# Altium PCB Skipper.PcbDoc (part 2 of 3)
Units mm, origin at the board's own origin, x right, y up, seen from the top; angles counter-clockwise.
Board outline 132 x 77.5 mm, 4 copper layers (L1, L2, L3, L4), stack 1.586 mm thick; 219 components, 173 nets, 859 pads, 487 vias.
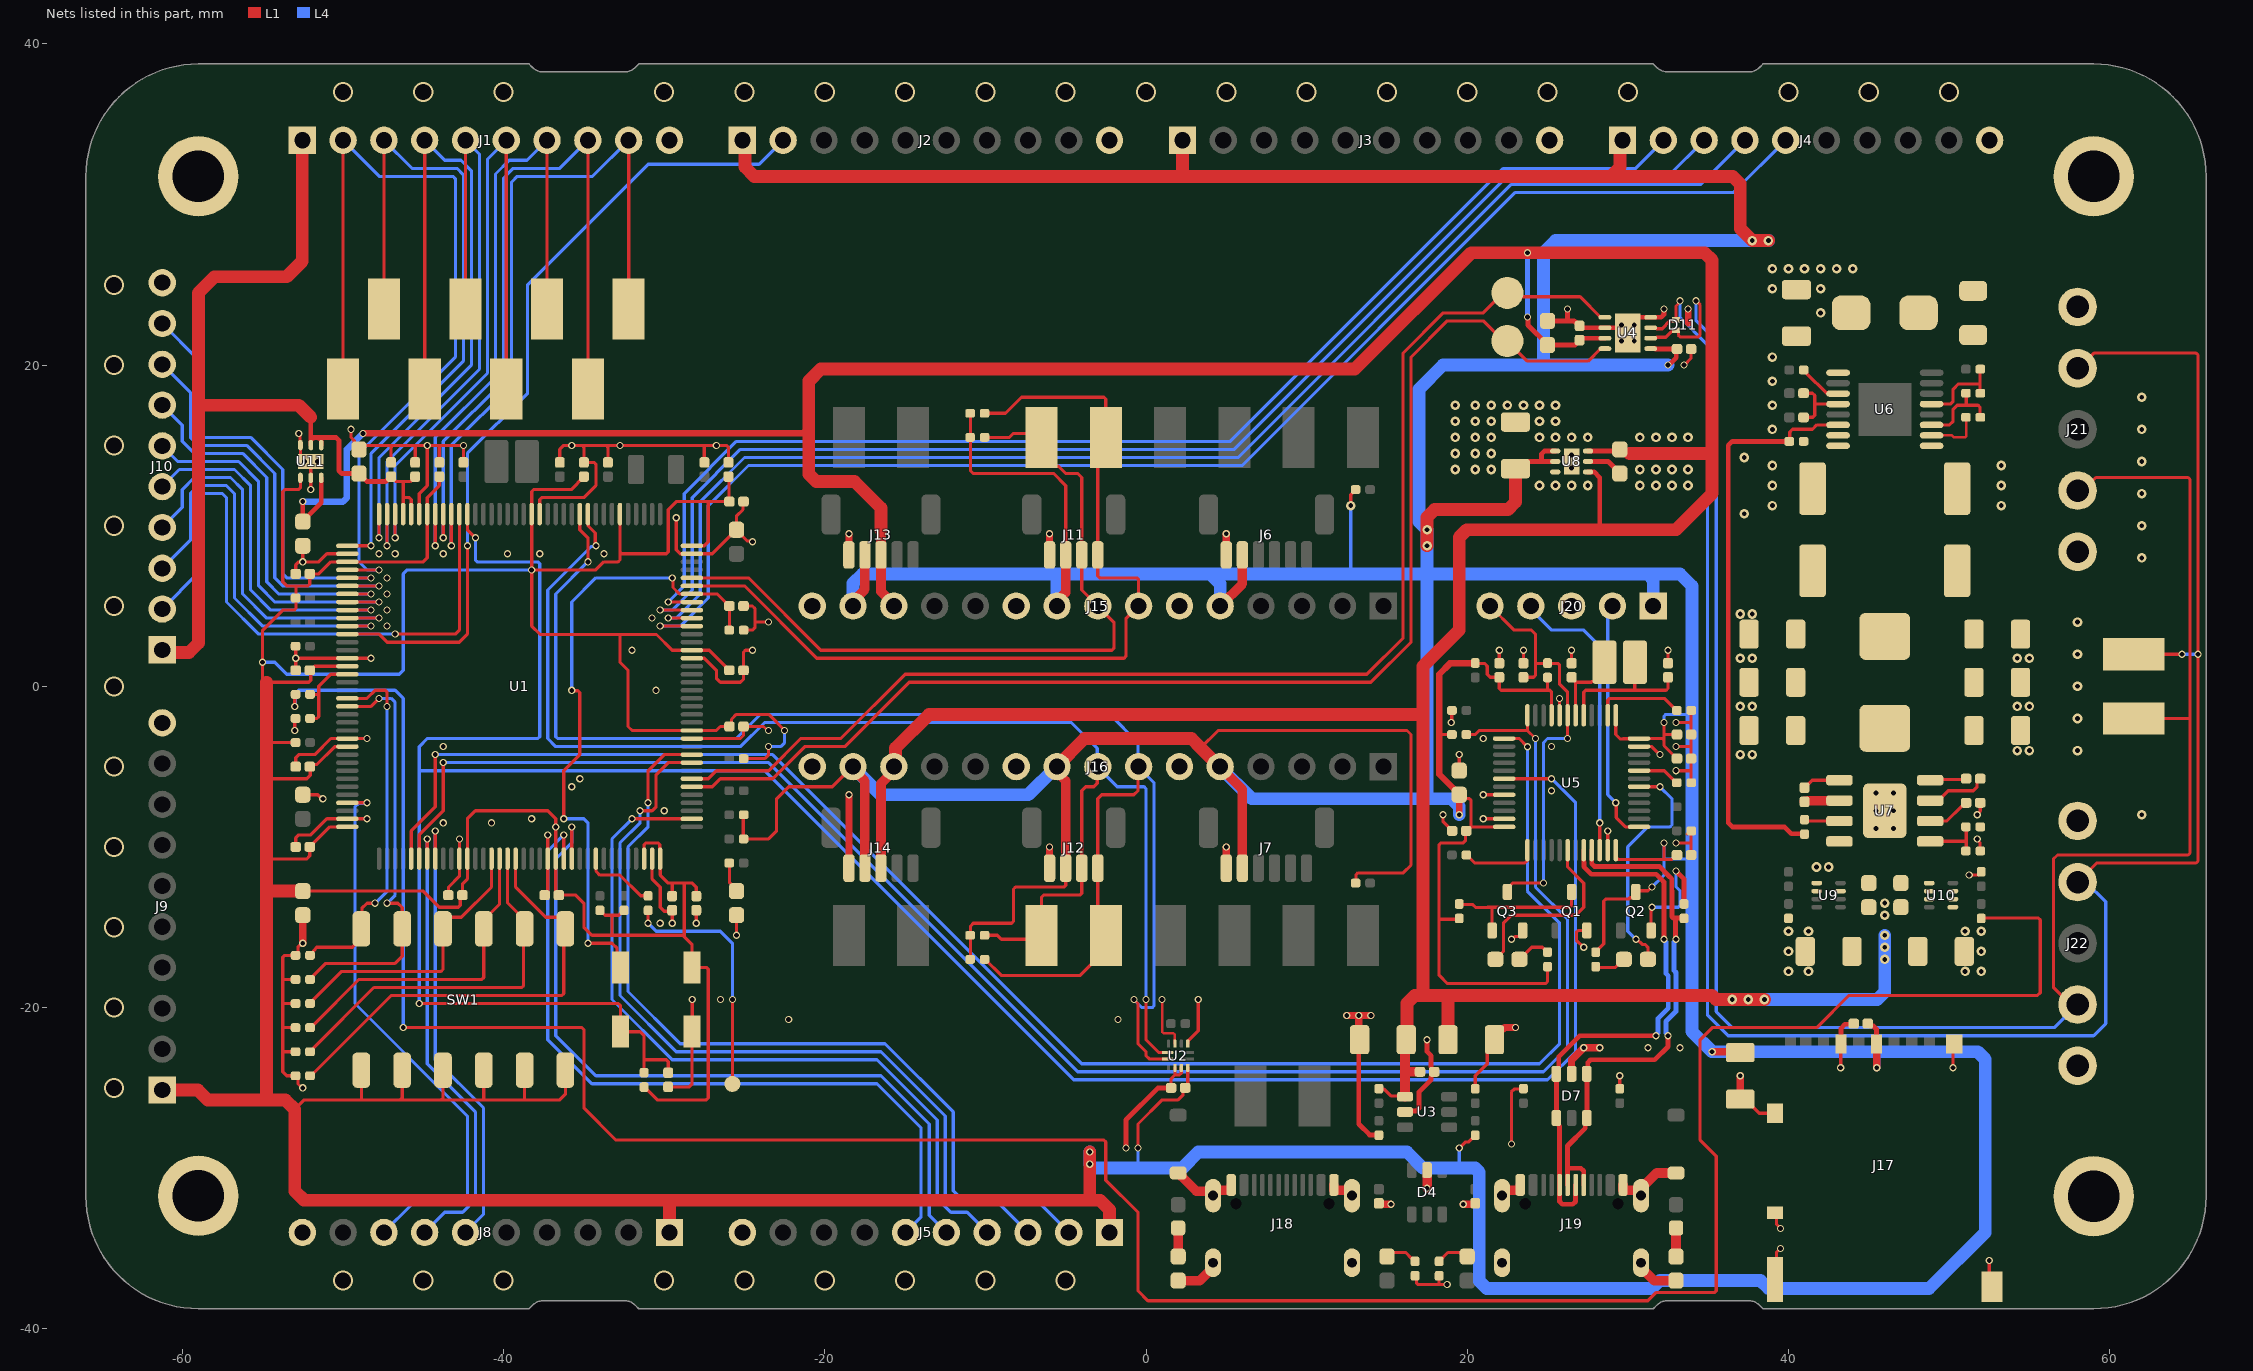
[diagram p4: the nets of this part, all layers, seen from the top]

## Via types
v1: diameter 0.45, hole 0.3, L1 to L4, tented both sides, 298 vias
v2: diameter 0.6, hole 0.3, L1 to L4, tented both sides, 127 vias
v3: diameter 1.25, hole 1, L1 to L4, 39 vias
v4: diameter 0.6, hole 0.3, L1 to L4, 15 vias
v5: diameter 0.5, hole 0.3, L1 to L4, 8 vias

## Nets (pads, with @x,y where several pads share a name; then routed paths per layer and width w, separated by ;. In a path a pad name is that pad's centre, name@x,y a point inside that pad or via, vN(x,y) a via of type N, cw(c..) or ccw(c..) an arc to the next point about the centre after c; other vN are vias at no path point)
3.3V: C7.2 C8.2 C9.2 C10.2 C11.2 C12.2 C13.2 C14.2 C15.2 C16.2 C17.2 C18.2 C19.2 C20.2 C21.2 C26.2 C27.2 C30.2 C38.2 C42.2 C43.2 C44.2 C45.2 C46.2 C47.2 C63.2 J2.1 J3.1 J4.1 J5.1 J6.2 J7.2 J8.1 J9.1 J11.2 J12.2 J13.2 J14.2 J15.5 J15.9 J15.14 J16.5 J16.9 J16.14 J17.4 J20.1 Q2.3 R1.2 R8.2 R14.2 R15.2 R16.2 R17.2 R20.2 R22.2 R23.2 R24.2 R25.2 R26.2 R27.2 R28.2 R33.2 R41.2 R42.2 R44.2 R46.2 R47.2 R49.1 SW1.1 SW1.2 SW1.3 SW1.4 SW1.5 SW1.6 SW2.2 U1.6 U1.17 U1.30 U1.39 U1.52 U1.62 U1.72 U1.84 U1.95 U1.106 U1.108 U1.121 U1.131 U1.144 U2.12 U4.5 U5.1 U5.9 U5.24 U5.36 U5.48 U8.1 U8.2 U11.4 | length 907.3
  L1 w0.2: -54.75,-10.75 -52.25,-10.75 -52.06,-10.56 C11.2@-52.06,-10 -50.81,-8.75 U1.72@-49.725,-8.75 ; -54.75,-5.75 -52.25,-5.75 -52.04,-5.54 -52.04,-5 C10.2@-52.06,-5 -51.928,-4.868 -51.618,-4.868 -50.515,-3.765 -49.74,-3.765 U1.62@-49.725,-3.75 ; -54.75,-3.5 R28.2@-52.925,-3.5 ; -53,-26.336 -52.414,-25.75 -48.85,-25.75 ; U11.4@-52.65,12.988 -52.65,12.367 -52.767,12.25 -53.633,12.25 -53.75,12.133 -53.75,6.5 -53.5,6.25 -53,6.25 ; C21.2@-52.5,-12.75 -45,-12.75 -44,-13.75 -42.808,-13.75 -42.691,-13.633 -42.691,-13.131 C12.2@-42.56,-13 -42.56,-12.31 -42.25,-12 U1.84@-42.25,-10.725 -42.25,-8.25 -41.75,-7.75 -37.25,-7.75 -36.75,-8.25 v1(-36.75,-8.75) U1.95@-36.75,-10.725 -36.75,-12.81 C13.2@-36.56,-13 ; U1.52@-49.725,1.25 -51.76,1.25 -52.01,1 C9.2@-52.06,1 -52,0.94 -52,0.367 -52.117,0.25 -54.75,0.25 -55,0.5 v1(-55,1.5) -55,3.5 -53.75,4.75 -53.042,4.75 -52.925,4.867 -52.925,5.5 -52.925,6.175 -53,6.25 ; SW1.1@-48.85,-23.9 -48.85,-25.75 ; SW1.2@-46.31,-23.9 -46.31,-25.62 -46.44,-25.75 ; C20.2@-44,13.06 -44,12.5 -44.75,11.75 U1.30@-44.75,10.725 -44.75,8 -45,7.75 U1.39@-49.725,7.75 -50.75,7.75 -51.5,7 C8.2@-52.06,7 -52.06,6.367 -52.177,6.25 -53,6.25 ; SW1.3@-43.77,-23.9 -43.77,-25.645 -43.875,-25.75 ; SW1.4@-41.23,-23.9 -41.23,-25.73 -41.25,-25.75 ; SW1.5@-38.69,-23.9 -38.69,-25.69 -38.75,-25.75 ; C13.2@-36.428,-13.132 C13.2@-36.56,-13 ; SW1.6@-36.15,-23.9 -36.15,-25.4 -36.5,-25.75 -38.75,-25.75 ; C19.2@-35,13.06 -35,13.04 -35.79,12.25 -38.133,12.25 -38.25,12.133 U1.17@-38.25,10.725 v1(-38.25,7.25) ; R22.2@-34,-13.955 -33.805,-14.15 -33.775,-14.15 -33.675,-14.25 -33.25,-14.25 ; U1.6@-32.75,10.725 -32.75,8.367 ; R23.2@-32.5,-13.925 -32.5,-13.955 -32.672,-14.127 -32.702,-14.127 -32.825,-14.25 -33.25,-14.25 ; R20.2@-31.25,-24.925 -31.25,-24.955 -31.078,-25.127 -31.048,-25.127 -30.425,-25.75 -27.367,-25.75 -27.25,-25.633 -27.25,-17.617 -27.367,-17.5 SW2.2@-28.275,-17.5 -28.275,-16.059 -28.75,-15.584 ; U1.106@-31.231,-10.744 U1.106@-31.25,-10.725 -31.25,-9.867 -31.133,-9.75 -30.386,-9.75 -30.269,-9.867 -30.269,-10.706 U1.108@-30.25,-10.725 -30.244,-10.731 -30.244,-11.756 -29.75,-12.25 -29.5,-12.25 ; C14.2@-29.5,-13.06 -29.5,-12.25 ; U1.144@-28.275,8.75 -28.269,8.756 -27.494,8.756 -27.25,9 -27.25,11.5 ; C15.2@-28,-13.06 -28,-12.5 -28.25,-12.25 -28.75,-12.25 ; C7.2@-26,13.06 -25.97,13.03 -25.97,11.53 C18.2@-25.94,11.5 -27.25,11.5 ; C17.2@-25.94,1 -27.184,2.244 -28.269,2.244 U1.131@-28.275,2.25 -29.5,2.25 -30.475,3.225 -32.75,3.225 ; C16.2@-25.92,-2.5 C16.2@-25.94,-2.5 ; R25.2@-25.075,-8 -25.075,-9.5 -23.5,-9.5 -23,-9 -23,-7 -22.25,-6.25 -19.53,-6.25 J16.14@-18.28,-5 ; R26.2@-25.075,-4.5 -23.75,-4.5 -23.5,-4.25 v1(-23.5,-3.75) ; v1(-22.5,-2.75) -23.5,-1.75 -25.5,-1.75 -25.808,-2.058 -25.808,-2.368 C16.2@-25.94,-2.5 ; R16.2@-10.925,-17 -10.925,-15.5 -10.925,-14.925 -10.75,-14.75 -8.367,-14.75 -8.25,-14.633 -8.25,-12.617 -8.133,-12.5 -5.117,-12.5 -5,-12.383 J12.2@-5,-11.32 ; R14.2@-10.925,17 -10.925,15.5 -10.925,13.425 -10.75,13.25 -5.75,13.25 -5,12.5 J11.2@-5,8.18 ; v1(-0.5,-28.75) -0.5,-27.25 1,-25.75 2,-25.75 2.308,-25.442 2.308,-25.132 C30.2@2.44,-25 2.6,-24.84 U2.12@2.6,-23.75 ; 3.415,-3.835 4.5,-2.75 16.25,-2.75 16.5,-3 16.5,-11.133 16.017,-11.615 13.192,-11.615 13.075,-11.733 R8.2@13.075,-12.25 ; v2(12.75,11.25) 12.75,11.925 12.873,12.048 12.873,12.078 13.045,12.25 R1.2@13.075,12.25 ; 18.25,-3 R44.2@19.075,-3 ; v1(19.5,-28.75) 19.871,-28.379 20.076,-28.379 20.5,-27.955 R33.2@20.5,-27.925 ; R46.2@19.5,-14.425 19.425,-14.5 18.25,-14.5 ; C42.2@19.5,-6.75 19.738,-6.988 20.123,-6.988 20.24,-7.105 20.24,-8.75 ; R49.1@20.5,1.425 21.075,1.425 21.25,1.25 21.25,0.75 21.44,0.56 C44.2@22,0.56 22,-0.133 22.117,-0.25 25,-0.25 ; U5.24@22.3,-8.75 20.24,-8.75 ; R42.2@25,-17.425 25,-18.383 24.883,-18.5 18.75,-18.5 18.25,-18 18.25,-14.5 ; R47.2@25,0.575 25,-0.25 ; U5.9@25.25,-1.8 25.25,-0.367 25.133,-0.25 25,-0.25 ; R41.2@28,-16.575 28,-16.525 28.5,-16.025 28.5,-13.367 28.617,-13.25 30.05,-13.25 30.132,-13.168 30.304,-13.168 30.5,-12.972 Q2.3@30.5,-12.8 30.5,-12.627 30.603,-12.73 31.258,-12.73 31.488,-12.5 v1(31.5,-12.5) ; U5.36@29.25,-10.2 29.25,-10.723 29.296,-10.769 29.404,-10.769 29.417,-10.783 32.25,-10.783 ; U5.1@29.25,-1.8 29.25,-3 29.532,-3.282 29.697,-3.282 29.71,-3.269 30.681,-3.269 U5.48@30.7,-3.25 32.155,-3.25 ; v1(32.25,-9.75) 32.25,-10.783 ; v1(32.25,-2.25) 32.25,-3 ; C46.2@33.06,-10.5 33.01,-10.5 32.728,-10.783 32.25,-10.783 ; C47.2@33.06,-4.5 32.25,-3.69 32.25,-3.345 ; C43.2@33.06,-3 32.25,-3 ; -48.85,-25.75 -46.44,-25.75 ; -46.44,-25.75 -43.875,-25.75 ; -43.875,-25.75 -41.25,-25.75 ; -41.25,-25.75 -38.75,-25.75 ; v1(-38.25,7.25) -38.25,3.75 -37.725,3.225 -32.75,3.225 ; v1(-38.25,7.25) -34.25,7.25 -33.75,7.75 -32.867,7.75 -32.75,7.867 -32.75,8.367 ; C13.2@-36.56,-13 -35.5,-13 -35,-13.5 -35,-15 -34.5,-15.5 -33.25,-15.5 ; -33.25,-15.5 -33.25,-14.25 ; -33.25,-15.5 -28.834,-15.5 -28.75,-15.584 ; -32.75,3.225 -32.75,1.5 -32.25,1 -32.25,-2.5 -32,-2.75 U1.121@-28.275,-2.75 -26.75,-2.75 -26.5,-2.5 C16.2@-25.94,-2.5 ; -32.75,8.367 -32.633,8.25 -29.867,8.25 -29.75,8.367 -29.75,11 -29.25,11.5 -27.25,11.5 ; -29.5,-12.25 -28.75,-12.25 ; -28.75,-15.584 -28.75,-12.25 ; 18.25,-14.5 18.25,-9.867 18.367,-9.75 19.75,-9.75 19.89,-9.61 19.89,-9.1 20.24,-8.75 ; 32.155,-3.25 32.25,-3.25 32.25,-3.345 ; 32.155,-3.25 32.25,-3.345 ; 32.25,-3.345 32.25,-3
  L1 w0.3: C63.2@23,13.55 23.316,13.55 23.766,14 24.627,14 ; U8.2@25.488,14 24.627,14 ; U8.1@25.488,14.65 24.803,14.65 24.627,14.474 24.627,14 ; U4.5@31.425,21.025 31.7,21.025 31.725,21 C38.2@33.06,21 33.012,20.952 33.012,20.462 32.579,20.029 32.529,20.029 v1(32.5,20) ; C26.2@44.94,-21 45.097,-21.157 45.297,-21.157 45.475,-21.335 J17.4@45.475,-22.275
  L1 w0.4: v1(19.5,-8) C42.2@19.5,-6.75 19.5,-6.725 18.25,-5.475 18.25,-3 18.25,0.75 18.925,1.425 R49.1@20.5,1.425
  L1 w0.45: v1(35.25,-22.75) C27.2@36.95,-22.75 ; J17.4@45.475,-22.275 45.5,-22.3 v1(45.5,-23.75)
  L1 w0.6: J16.14@-18.28,-5 -18.28,-5.121 -17.5,-5.901 J14.2@-17.5,-11.32 ; J15.14@-18.24,5 -18.24,5.298 -17.5,6.038 J13.2@-17.5,8.18 ; J16.9@-5.58,-5 -5.58,-5.298 -5,-5.878 J12.2@-5,-11.32 ; J15.9@-5.54,5 -5.54,5.298 -5,5.838 J11.2@-5,8.18 ; J16.5@4.58,-5 6,-6.42 J7.2@6,-11.32 ; J15.5@4.62,5 6,6.38 J6.2@6,8.18
  L1 w0.8: J9.1@-61.25,-25.13 -59.034,-25.13 -58.414,-25.75 -54.75,-25.75 ; -54.75,0.25 -54.75,-3.5 -54.75,-5.75 -54.75,-10.75 -54.75,-12.75 ; C21.2@-52.5,-12.75 -54.75,-12.75 ; J8.1@-29.67,-34 -29.67,-32.17 -29.5,-32 ; J2.1@-25.13,34 -24.973,33.843 -24.973,32.336 -24.387,31.75 2.25,31.75 ; J16.9@-5.58,-5 -3.83,-3.25 2.83,-3.25 3.415,-3.835 J16.5@4.58,-5 ; v1(-3.5,-29) v1(-3.5,-29.75) -3.5,-32 ; J5.1@-2.27,-34 -2.27,-32.586 -2.856,-32 -3.5,-32 ; J3.1@2.27,34 2.27,31.77 2.25,31.75 ; v2(17.5,8.75) v2(17.5,9.75) 17.5,10.531 17.969,11 22.531,11 23,11.469 C63.2@23,13.55 ; J4.1@29.67,34 29.513,33.843 29.513,32.336 28.927,31.75 ; C27.2@36.95,-22.75 C27.2@37,-22.8 ; v2(38.75,27.75) v2(37.75,27.75) 37,28.5 37,31.281 36.531,31.75 28.927,31.75 ; -54.75,-25.75 -53.586,-25.75 -53,-26.336 -53,-31.414 -52.414,-32 -29.5,-32 ; -54.75,-25.75 -54.75,-12.75 ; -29.5,-32 -3.5,-32 ; 2.25,31.75 28.927,31.75
  L4 w0.2: v1(-55,1.5) -54.25,1.5 -53.5,0.75 -46.5,0.75 -46.25,1 -46.25,7 -46,7.25 v1(-38.25,7.25) ; v1(-23.5,-3.75) -22.75,-3.75 -22.5,-3.5 v1(-22.5,-2.75) ; -0.75,-30 -0.5,-29.75 v1(-0.5,-28.75) ; 12.75,7 v2(12.75,11.25) ; 19.25,-30 19.5,-29.75 v1(19.5,-28.75) ; v1(31.5,-12.5) 32.25,-11.75 32.25,-10.75 ; v1(32.25,-9.75) 32.25,-10.75 ; v1(32.25,-2.25) 32.25,-1.867 32.367,-1.75 34,-1.75 ; 34,-10.75 32.25,-10.75
  L4 w0.45: v1(45.5,-23.75) 45.5,-22.75
  L4 w0.8: J16.14@-18.28,-5 -16.53,-6.75 -7.33,-6.75 J16.9@-5.58,-5 ; J15.14@-18.24,5 -18.24,6.414 -17.654,7 -5.5,7 ; J15.9@-5.54,5 -5.54,6.96 -5.5,7 ; v1(-3.5,-29) v1(-3.5,-29.75) -3.25,-30 -0.75,-30 2.25,-30 3.25,-29 16.25,-29 17.25,-30 19.25,-30 20.5,-30 20.75,-30.25 20.75,-37.031 21.219,-37.5 31.5,-37.5 32,-37 38.25,-37 38.75,-37.5 48.75,-37.5 52.25,-34 52.25,-23.219 51.781,-22.75 45.5,-22.75 v1(35.25,-22.75) 34,-21.5 34,-10.75 34,-1.75 34,6.25 33.25,7 31.22,7 ; J16.5@4.58,-5 6.58,-7 17.5,-7 ; J15.5@4.62,5 4.62,6.38 4,7 ; v1(19.5,-8) 19.5,-7.469 19.031,-7 17.5,-7 ; J20.1@31.58,5 31.58,6.64 31.22,7 ; v1(32.5,20) 24.75,20 ; v2(38.75,27.75) v2(37.75,27.75) 25.5,27.75 24.75,27 24.75,20 ; -5.5,7 4,7 ; 4,7 12.75,7 17.5,7 ; 17.5,-7 17.5,7 ; 17.5,7 v2(17.5,8.75) v2(17.5,9.75) 17,10.25 17,18.5 18.5,20 24.75,20 ; 17.5,7 31.22,7
3.3VA: C22.2 C23.2 C69.2 J1.1 J10.1 U1.32 U1.33 U11.1 U11.2 | length 61.8
  L1 w0.2: C23.2@-47,13.06 -46.69,12.75 -46.255,12.75 ; U1.33@-46.25,10.725 -46.25,11.75 ; U1.32@-45.75,10.725 -45.75,11.633 -45.867,11.75 -46.25,11.75 ; C22.2@-45.632,12.928 C22.2@-45.5,13.06 -45.51,13.06 -45.82,12.75 -46.255,12.75 ; -46.255,12.75 -46.25,12.745 -46.25,11.75
  L1 w0.3: U11.2@-52,15.012 U11.2@-52,15.311 ; -52,16.75 U11.2@-52,15.311 ; U11.1@-51.35,15.2 -51.35,15.012 -51.35,15.311 -51.526,15.487 ; C23.2@-47,13.06 -47,13.043 -47.16,12.883 -47.203,12.883 -47.336,12.75 -48.499,12.75 C69.2@-49,13.25 -50.074,13.25 -50.25,13.426 -50.25,15.311 -50.426,15.487 -51.526,15.487 ; U11.2@-52,15.311 -51.824,15.487 -51.526,15.487
  L1 w0.8: J10.1@-60.9,2.113 -59.586,2.113 -59,2.699 -59,17.5 ; J1.1@-52.53,34 -52.53,26.47 -53.5,25.5 -58,25.5 -59,24.5 -59,17.5 ; -52,16.75 -52.75,17.5 -59,17.5
  L1 w1: J10.1@-61.25,2.27 -61.057,2.27 J10.1@-60.9,2.113
5V: C31.2 C32.2 C33.2 C36.2 C37.2 C62.2 C66.2 C67.2 C68.2 J13.3 J14.3 J15.13 J16.13 R32.2 U3.1 U4.3 U8.4 U8.6 U10.2 U10.7 U11.6 | length 289.1
  L1 w0.2: R32.2@14.5,-25.075 14.825,-25.075 15.25,-25.5 16.075,-25.5 U3.1@16.125,-25.55
  L1 w0.3: v1(-52.5,11.5) -52.5,10.275 -51.35,11.425 U11.6@-51.35,12.988 ; v1(23.75,23) 23.779,22.971 23.779,22.496 25,21.275 C36.2@25,21.25 26.707,21.25 27.132,21.675 U4.3@28.575,21.675 ; U8.4@27.513,13.35 27.9,13.35 28.25,13 28.25,9.75 ; U8.6@27.513,14.65 29.4,14.65 C62.2@29.5,14.75 29.769,14.481 30.103,14.481 ; 32.179,14.487 32.442,14.75
  L1 w0.4: v1(-48.75,15.75) -21.359,15.75 -21,16.109
  L1 w0.6: J14.3@-16.5,-11.32 -16.5,-6.058 -15.74,-5.298 J16.13@-15.74,-5 ; -16.5,9.75 J13.3@-16.5,8.18 -16.5,5.901 -15.7,5.101 J15.13@-15.7,5 ; U3.1@16.125,-25.55 16.125,-24 ; C31.2@16.2,-22 16.125,-22.075 16.125,-24 ; C33.2@17.06,-24 16.125,-24
  L1 w0.8: -16.5,9.75 -16.5,11.1 -18.15,12.75 -20.531,12.75 -21,13.219 -21,16.109 -21,19 -20.25,19.75 13,19.75 20.25,27 v1(23.75,27) 34.781,27 35.25,26.531 35.25,14.281 ; J16.13@-15.74,-5 -15.595,-4.855 -15.595,-3.845 -13.5,-1.75 17.25,-1.75 ; C31.2@16.2,-22 16.25,-21.95 16.25,-19.734 16.734,-19.25 17.25,-19.25 ; C32.2@18.8,-22 18.8,-19.45 19,-19.25 ; 30.103,14.487 32.179,14.487 35.045,14.487 35.25,14.281 ; v2(38.5,-19.5) v2(37.5,-19.5) v2(36.5,-19.5) 35.5,-19.5 35.25,-19.25 19,-19.25 ; 17.25,-19.25 19,-19.25 ; 17.25,-19.25 17.25,-1.75 ; 17.25,-1.75 17.25,1.25 19.5,3.5 19.5,9.281 19.969,9.75 28.25,9.75 33,9.75 35.25,12 35.25,14.281
  L4 w0.3: v1(23.75,23) v1(23.75,27)
  L4 w0.4: v1(-52.5,11.5) -50,11.5 -49.75,11.75 -49.75,14.75 v1(-48.75,15.75)
  L4 w0.8: v2(36.5,-19.5) v2(37.5,-19.5) v2(38.5,-19.5) 45.531,-19.5 46,-19.031 v2(46,-17) v2(46,-16.25) v2(46,-15.5)
5V_BUCK: C56.2 C57.2 C58.2 L1.2 R10.2 R56.2 R62.2 U10.3 U10.5 | length 171.9
  L1 w0.2: v1(-53,-1.25) -53,-0.575 R10.2@-52.925,-0.5 ; v1(-46.25,-21.25) -35.117,-21.25 -35,-21.367 -35,-26.25 -33,-28.25 -2.617,-28.25 -2.5,-28.367 -2.5,-30.75 -0.5,-32.75 -0.5,-37.633 0.117,-38.25 31.25,-38.25 31.75,-37.75 35.383,-37.75 35.5,-37.633 35.5,-29.25 34.5,-28.25 34.5,-22 35.25,-21.25 41.75,-21.25 43.75,-19.25 55.5,-19.25 55.675,-19.075 55.675,-14.542 55.558,-14.425 R62.2@52,-14.425
  L4 w0.2: v1(-53,-1.25) -52.975,-1.225 -52.975,-0.475 -52.75,-0.25 -46.75,-0.25 -46.25,-0.75 v1(-46.25,-21.25)
5V_USB: C64.2 C65.2 U9.2 U9.7 U10.6
BOOT_0_3: C25.2 R21.2 SW2.1 U1.138 | length 39.6
  L1 w0.2: v1(-36.25,-8.25) -36.25,-5.25 -35.25,-4.25 -35.25,-0.392 -35.367,-0.275 -35.725,-0.275 v1(-35.75,-0.25) ; v1(-34.75,-16) -33.25,-16 -32.933,-16.317 -32.933,-17.292 SW2.1@-32.725,-17.5 ; v1(-29.5,6.75) -29.452,6.702 -29.452,6.152 -29.054,5.754 -28.279,5.754 U1.138@-28.275,5.75 -26.69,5.75 C25.2@-25.94,5 -25.94,3.515 R21.2@-25.925,3.5
  L4 w0.2: v1(-36.25,-8.25) -35,-8.25 -34.75,-8.5 v1(-34.75,-16) ; v1(-35.75,-0.25) -35.75,5.25 -34.25,6.75 v1(-29.5,6.75)
BUCK_BOOT_10: C48.2 U7.7 | length 3.9
  L1 w0.2: U7.7@48.825,-7.115 49.325,-7.115 49.94,-6.5 51.5,-6.5 51.744,-6.256 51.744,-5.946 C48.2@51.94,-5.75
BUCK_DETECT_2: R10.1 R13.2 U1.53 | length 5.2
  L1 w0.2: R13.2@-52.075,-2 -51.617,-2 -51.5,-1.883 -51.5,-0.5 ; R10.1@-52.075,-0.5 -51.5,-0.5 ; U1.53@-49.725,0.75 -50.75,0.75 -51.5,0 -51.5,-0.5
BUCK_EN_10: R54.1 U7.3 | length 2.2
  L1 w0.2: R54.1@41,-8.385 U7.3@43.175,-8.385
BUCK_FB_10: R56.1 R58.2 U7.5 | length 3.8
  L1 w0.2: U7.5@48.837,-9.643 50.962,-9.643 51.075,-9.757 ; R58.2@51.075,-10.25 51.075,-9.757 ; R56.1@51.075,-8.75 51.075,-9.757
BUCK_SW_10: C48.1 L1.1 U7.8 | length 2.3
  L1 w0.2: U7.8@48.825,-5.845 48.872,-5.797 51.012,-5.797 C48.1@51.06,-5.75
BUCK_VCC_10: C55.2 U7.6 | length 2.7
  L1 w0.2: U7.6@48.825,-8.385 49.865,-8.385 50.79,-7.46 50.8,-7.46 51.01,-7.25 C55.2@51.06,-7.25
CAN_H: D11.1 J21.4 J22.4 TP30.1 U4.7 | length 135.2
  L1 w0.2: U4.7@31.425,22.325 31.727,22.325 31.787,22.265 32.137,22.265 32.622,22.75 32.925,22.75 D11.1@33,22.825 33,23.682 33.25,23.932 v1(33.25,24) ; J22.4@58,-12.19 59.19,-11 65.383,-11 65.5,-10.883 v1(65.5,2) 65.5,20.633 65.383,20.75 59.016,20.75 58.076,19.81 J21.4@58,19.81 ; TP30.1@61.5,2 v1(64.5,2)
  L4 w0.2: v1(33.25,24) 33.25,22.976 34.953,21.273 34.953,-20.453 36.25,-21.75 59,-21.75 59.75,-21 59.75,-13.417 58.523,-12.19 J22.4@58,-12.19 ; v1(64.5,2) v1(65.5,2)
CAN_L: D11.2 J21.2 J22.2 TP31.1 U4.6 | length 126.9
  L1 w0.2: U4.6@31.425,21.675 31.727,21.675 31.787,21.735 32.357,21.735 32.722,22.1 32.925,22.1 D11.2@33,22.175 33.075,22.175 33.15,22.1 33.15,21.867 33.267,21.75 34.383,21.75 34.5,21.867 34.5,23.75 v1(34.25,24) ; J22.2@58,-19.81 57.577,-19.81 56.5,-18.733 56.5,-10.75 56.75,-10.5 64.883,-10.5 65,-10.383 65,-2 ; J21.2@58,12.19 58.336,12.19 59.146,13 64.883,13 65,12.883 65,-2 ; TP31.1@61.5,-2 65,-2
  L4 w0.2: v1(34.25,24) 34.25,22.75 35.5,21.5 35.5,-20.25 36.5,-21.25 56.56,-21.25 J22.2@58,-19.81
DAP_BOOT_9: R40.2 U5.44 | length 2.7
  L1 w0.2: U5.44@30.7,-5.25 32.275,-5.25 33.025,-6 R40.2@33.075,-6
DAP_D_N: D7.3 D7.4 J19.A7 J19.B7 U5.32 | length 34.4
  L1 w0.3: D7.3@25.55,-24.125 25.7,-23.975 25.7,-23.05 27,-21.75 v1(31.75,-21.75) ; D7.3@25.55,-24.058 D7.4@25.55,-26.875 25.7,-27.025 25.7,-27.351 25.75,-27.401 J19.B7@25.75,-31.045 25.75,-32.074 25.926,-32.25 26.574,-32.25 26.75,-32.074 J19.A7@26.75,-31.045 ; U5.32@27.25,-10.2 27.25,-10.957 27.264,-10.971 27.264,-11.238 27.724,-11.699 31.761,-11.699 32.108,-12.045 32.25,-12.188 v1(32.25,-15.75)
  L4 w0.3: v1(31.75,-21.75) 31.75,-21.709 31.882,-21.578 31.882,-20.667 32.514,-20.035 32.514,-18.017 32.382,-17.886 32.382,-15.922 32.25,-15.791 v1(32.25,-15.75)
DAP_D_P: D7.1 D7.6 J19.A6 J19.B6 R52.1 U5.33 | length 33.4
  L1 w0.3: J19.A6@26.25,-31.045 26.25,-30.269 26.243,-30.262 26.243,-30 ; J19.B6@27.25,-31.045 27.25,-30.176 27.074,-30 26.243,-30 ; U5.33@27.75,-10.2 27.75,-11.037 27.926,-11.212 31.962,-11.212 32.594,-11.844 32.736,-11.986 32.736,-12.72 32.746,-12.729 32.746,-14.346 32.971,-14.571 32.971,-15.721 v1(33,-15.75) ; v1(32.5,-21.75) 32.5,-22.427 31.677,-23.25 27.675,-23.25 27.499,-23.426 27.499,-24.076 D7.1@27.45,-24.125 D7.6@27.45,-26.875 27.345,-26.98 27.345,-27.518 26.243,-28.62 26.243,-30 ; 32.825,-14.425 R52.1@33.5,-14.425
  L4 w0.3: v1(32.5,-21.75) 32.5,-21.709 32.368,-21.578 32.368,-20.868 33,-20.236 33,-17.816 32.868,-17.684 32.868,-15.922 33,-15.791 v1(33,-15.75)
DAP_LED_1_9: D9.K U5.30 | length 11.8
  L1 w0.2: D9.K@21.75,-17 21.758,-17 22.25,-16.508 22.25,-14.75 22.75,-14.25 26.75,-14.25 27.25,-13.75 27.25,-12.25 26.25,-11.25 U5.30@26.25,-10.2
DAP_LED_2_9: D8.K U5.42 | length 15
  L1 w0.2: v1(30.5,-15.75) 30.568,-15.75 30.885,-16.067 31.067,-16.067 31.25,-16.25 D8.K@31.25,-17 ; U5.42@30.7,-6.25 v1(32,-6.25)
  L4 w0.2: v1(30.5,-15.75) 30,-15.25 30,-10 31.25,-8.75 32.633,-8.75 32.75,-8.633 32.75,-7 v1(32,-6.25)
DAP_NRST_G_9: Q1.3 Q3.1 R46.1 | length 9.4
  L1 w0.2: R46.1@19.5,-13.575 20.325,-13.575 20.516,-13.766 21.266,-13.766 ; 21.266,-13.75 21.55,-13.75 ; Q3.1@21.55,-15.2 21.55,-13.75 ; Q1.3@26.5,-12.8 26.5,-13.633 26.383,-13.75 21.55,-13.75
DAP_PB12_9: R43.2 U5.25 | length 4.7
  L1 w0.2: R43.2@19.925,-10.5 19.975,-10.5 20.475,-11 23.583,-11 23.731,-10.852 23.731,-10.219 U5.25@23.75,-10.2
DAP_PC13_9: R45.2 U5.2 | length 5.6
  L1 w0.2: U5.2@28.75,-1.8 28.75,-0.867 28.867,-0.75 32.275,-0.75 33.025,-1.5 R45.2@33.075,-1.5
DAP_R\E\S\E\T\_9: C39.1 J20.5 Q3.3 R47.1 U5.7 | length 26.2
  L1 w0.2: J20.5@21.42,5 22.92,3.5 24,3.5 24.25,3.25 24.25,1.425 ; Q3.3@22.5,-12.8 22.5,-12.573 22.7,-12.373 22.7,-12.367 22.817,-12.25 v1(24.75,-12.25) ; C39.1@23.5,0.56 24.133,0.56 24.25,0.677 24.25,1.425 ; v1(26.25,-3.25) U5.7@26.25,-1.8 26.25,-0.367 25.75,0.133 25.75,1.308 25.633,1.425 25,1.425 24.25,1.425
  L4 w0.2: v1(24.75,-12.25) 24.75,-3.5 25,-3.25 v1(26.25,-3.25)
DAP_RX: U1.77 U5.13 | length 106.6
  L1 w0.2: U1.77@-45.75,-10.725 -45.75,-9 -44.25,-7.5 v1(-44.25,-4.25) ; U5.13@22.3,-3.25 23.236,-3.25 v1(23.75,-3.764)
  L4 w0.2: v1(-44.25,-4.25) -23.25,-4.25 -4,-23.5 24.5,-23.5 25.75,-22.25 25.75,-14.75 23.75,-12.75 v1(23.75,-3.764)
DAP_SWCLK_9: J20.2 U5.37 | length 15.2
  L1 w0.2: v1(29.25,-7.25) 29.275,-7.275 29.275,-8.175 29.85,-8.75 U5.37@30.7,-8.75
  L4 w0.2: J20.2@29.04,5 28.753,4.713 28.753,4.136 28.75,4.133 28.75,-6.738 29.25,-7.238 v1(29.25,-7.25)
DAP_SWDIO_9: J20.4 U5.34 | length 18.1
  L1 w0.2: U5.34@28.25,-10.2 v1(28.25,-8.5)
  L4 w0.2: J20.4@23.96,5 23.96,4.79 25.25,3.5 27.25,3.5 28.25,2.5 v1(28.25,-8.5)
DAP_TX: R44.1 U1.78 U5.12 | length 110.9
  L1 w0.2: U1.78@-45.25,-10.725 -45.25,-9.25 -43.75,-7.75 v1(-43.75,-4.75) ; R44.1@19.925,-3 20.5,-3 20.75,-2.75 23.75,-2.75 ; U5.12@23.75,-1.8 23.75,-2.75 ; v1(24.25,-3.25) 23.75,-2.75
  L4 w0.2: v1(-43.75,-4.75) -23.5,-4.75 -4.25,-24 24.75,-24 26.25,-22.5 26.25,-14.5 24.25,-12.5 v1(24.25,-3.25)
DAP_XTAL_IN_9: C40.2 U5.5 X3.1 | length 9.2
  L1 w0.2: U5.5@27.25,-1.8 27.25,-0.367 27.367,-0.25 30.428,-0.25 ; X3.1@30.45,1.5 30.428,1.478 30.428,-0.25 ; C40.2@32.5,0.56 32.5,-0.133 32.383,-0.25 30.428,-0.25
DAP_XTAL_OUT_9: C41.2 U5.6 X3.2 | length 5.1
  L1 w0.2: C41.2@26.5,0.56 26.5,0.51 26.75,0.26 ; U5.6@26.75,-1.8 26.75,0.26 ; X3.2@28.55,1.5 28.55,0.947 27.907,0.304 27.773,0.304 27.729,0.26 26.75,0.26
DIP0_2: R7.2 SW1.12 U1.56 | length 22.7
  L1 w0.2: R7.2@-52.075,-16.75 -51.952,-16.612 -51.627,-16.25 -49.417,-16.25 -49,-15.833 -49,-15.25 SW1.12@-48.85,-15.1 -48.817,-15.067 -48.817,-13.817 -48.5,-13.5 v1(-48,-13.5) ; U1.56@-49.725,-0.75 -48.5,-0.75 -48,-0.25 -47.367,-0.25 -47.25,-0.367 v1(-47.25,-1.25)
  L4 w0.2: v1(-48,-13.5) -47.25,-12.75 v1(-47.25,-1.25)
DIP1_2: R6.2 SW1.11 U1.57 | length 26.4
  L1 w0.2: R6.2@-52.075,-18.25 -51.075,-17.25 -46.75,-17.25 -46.31,-16.81 SW1.11@-46.31,-15.1 -46.31,-13.772 -46.582,-13.5 v1(-47.25,-13.5) ; U1.57@-49.725,-1.25 -48.25,-1.25 v1(-47.75,-0.75)
  L4 w0.2: v1(-47.75,-0.75) -47,-0.75 -46.75,-1 -46.75,-13 v1(-47.25,-13.5)
DIP2_2: R5.2 SW1.10 U1.87 | length 17.8
  L1 w0.2: R5.2@-52.075,-19.75 -52.045,-19.75 -51.85,-19.555 -51.85,-19.525 -50.075,-17.75 -43.887,-17.75 -43.77,-17.633 SW1.10@-43.77,-15.1 -43.77,-14.812 -43.333,-14.375 -42.625,-14.375 -40.75,-12.5 U1.87@-40.75,-10.725
DIP3_2: R4.2 SW1.9 U1.88 | length 19.9
  L1 w0.2: R4.2@-52.075,-21.25 -52.005,-21.25 -51.83,-21.075 -51.825,-21.075 -49,-18.25 -41.347,-18.25 -41.23,-18.133 SW1.9@-41.23,-15.1 -41.23,-14.55 -40.25,-13.57 U1.88@-40.25,-10.725
DIP4_2: R3.2 SW1.8 U1.89 | length 23.6
  L1 w0.2: R3.2@-52.19,-22.865 -52.161,-22.865 -51.85,-22.555 -51.85,-22.525 -48.075,-18.75 -38.867,-18.75 -38.75,-18.633 -38.75,-14.885 -38.69,-14.825 -38.69,-14.55 -39.75,-13.49 U1.89@-39.75,-10.725
DIP5_2: R2.2 SW1.7 U1.90 | length 28.1
  L1 w0.2: R2.2@-52.027,-24.277 -52.027,-24.272 -51.83,-24.075 -51.825,-24.075 -47,-19.25 -36.367,-19.25 -36.25,-19.133 -36.25,-15.2 SW1.7@-36.15,-15.1 -36.15,-14.812 -36.587,-14.375 -37.375,-14.375 -39.25,-12.5 U1.90@-39.25,-10.725
EFUSE_DVDT_10: C60.2 C61.2 U6.12 | length 4.2
  L1 w0.2: C61.2@40.94,16.75 41.518,16.75 41.635,16.867 41.635,17.575 ; C60.2@40.94,18.25 41.5,18.25 41.635,18.115 41.635,17.575 ; U6.12@43.087,17.575 41.635,17.575
EFUSE_ILIM_10: R60.2 U6.11 | length 2.8
  L1 w0.2: R60.2@40.925,19.7 40.955,19.7 41.15,19.504 41.15,19.475 42.352,18.273 43.04,18.273 U6.11@43.087,18.225
EFUSE_OUT_10: C49.A C50.A C51.2 C52.2 C53.2 C54.2 R53.1 U6.15 U6.16 U7.2 | length 2.2
  L1 w0.6: C54.2@41,-7.19 41,-7.17 41.01,-7.16 41.155,-7.16 41.2,-7.115 U7.2@43.175,-7.115
EFUSE_OVP_10: R57.1 R59.2 U6.5 | length 5.5
  L1 w0.2: U6.5@48.912,17.575 50.075,17.575 50.25,17.75 50.25,18.5 50.575,18.825 51.925,18.825 ; R57.1@51.925,18.25 51.925,18.825 ; R59.2@51.925,19.75 51.925,18.825
EFUSE_PGOOD_10: R53.2 R54.2 U6.14 | length 36.2
  L1 w0.2: R53.2@40.075,15.25 40.075,15.825 40.25,16 41.5,16 41.775,16.275 U6.14@43.087,16.275
  L1 w0.3: R53.2@40.075,15.25 36.5,15.25 36.25,15 36.25,-8.5 36.5,-8.75 39.75,-8.75 40.175,-9.175 R54.2@41,-9.175
EFUSE_UVLO_10: R55.1 R57.2 U6.3 | length 5.4
  L1 w0.2: U6.3@48.912,16.275 50.025,16.275 50.25,16.5 50.25,17.25 50.5,17.5 51.075,17.5 ; R57.2@51.075,18.25 51.075,17.5 ; R55.1@51.925,16.75 51.925,17.383 51.808,17.5 51.075,17.5
FDCAN_RX: TP29.1 U1.114 U4.4 | length 80.6
  L1 w0.2: U1.114@-28.275,-6.25 -27,-6.25 -26.5,-5.75 -23.25,-5.75 -21.25,-3.75 -18.75,-3.75 -14.75,0.25 14,0.25 16.5,2.75 16.5,20.5 18.75,22.75 21,22.75 22.25,21.5 TP29.1@22.5,21.5 23.75,20.25 27.525,20.25 28.3,21.025 U4.4@28.575,21.025
FDCAN_TX: TP28.1 U1.115 U4.1 | length 80.4
  L1 w0.2: U1.115@-28.275,-5.75 -27.25,-5.75 -26.75,-5.25 -23.5,-5.25 -21.5,-3.25 -19,-3.25 -15,0.75 13.75,0.75 16,3 16,20.75 18.5,23.25 21,23.25 22.25,24.5 TP28.1@22.5,24.5 22.75,24.25 27.025,24.25 28.3,22.975 U4.1@28.575,22.975
GND: C1.1 C2.1 C3.1 C4.1 C5.1 C6.1 C7.1 C8.1 C9.1 C10.1 C11.1 C12.1 C13.1 C14.1 C15.1 C16.1 C17.1 C18.1 C19.1 C20.1 C21.1 C22.1 C23.1 C24.1 C25.1 C26.1 C27.1 C28.1 C29.1 C30.1 C31.1 C32.1 C33.1 C34.1 C35.1 C36.1 C37.1 C38.1 C39.2 C40.1 C41.1 C42.1 C43.1 C44.1 C45.1 C46.1 C47.1 C49.K C50.K C51.1 C52.1 C53.1 C54.1 C55.1 C56.1 C57.1 C58.1 C59.1 C62.1 C63.1 C64.1 C65.1 C66.1 C67.1 C68.1 C69.1 D1.K D3.A D4.2 D6.A D7.2 D10.1 D11.3 J1.10 J2.10 J3.10 J4.10 J5.10 J6.1 J7.1 J8.10 J9.10 J10.10 J11.1 J12.1 J13.1 J14.1 J15.6 J15.10 J15.15 J16.6 J16.10 J16.15 J17.6 J17.MP1 J17.MP2 J17.MP3 J17.MP4 J17.SWA J18.A1/B12 J18.B1/A12 J18.SHELL1 J18.SHELL2 J18.SHELL3 J18.SHELL4 J19.A1/B12 J19.B1/A12 J19.SHELL1 J19.SHELL2 J19.SHELL3 J19.SHELL4 J20.3 J21.1 J22.1 pad.10 Q1.2 Q3.2 R2.1 R3.1 R4.1 R5.1 R6.1 R7.1 R12.1 R13.1 R21.1 R31.1 R34.1 R35.1 R37.1 R38.1 R39.1 R40.1 R45.1 R48.2 R51.1 R58.1 R63.1 R64.1 SW3.2 U1.16 U1.31 U1.38 U1.51 U1.61 U1.71 U1.83 U1.94 U1.107 U1.120 U1.130 U1.143 U2.3 U2.5 U2.10 U2.11 U3.2 U4.2 U4.8 U4.9 U5.8 U5.20 U5.23 U5.35 U5.47 U6.9 U7.1 U7.4 U7.9 U8.3 U8.5 U8.EP U9.1 U10.1 U11.3 U11.5 U11.EP | length 264.8
  L1 w0.152: v1(1,-19.5) 1,-21.511 1.089,-21.6 1.711,-21.6 1.8,-21.689 U2.5@1.8,-22.25 ; U2.10@1.8,-23.75 U2.10@1.82,-23.73
  L1 w0.2: v1(-53,-2.75) -53,-2.075 R13.1@-52.925,-2 ; C11.1@-52.94,-10 -52.94,-9.44 -52.75,-9.25 -52,-9.25 -51,-8.25 U1.71@-49.725,-8.25 v1(-48.5,-8.25) ; C10.1@-52.94,-5 -52.94,-4.44 -52.75,-4.25 -51.75,-4.25 -50.75,-3.25 U1.61@-49.725,-3.25 v1(-48.5,-3.25) ; C9.1@-52.94,1 -52.94,1.713 -52.903,1.75 U1.51@-49.725,1.75 v1(-48.25,1.75) ; C8.1@-52.94,7 -52.94,7.56 -52.75,7.75 v1(-52.5,7.75) ; v1(-52.932,1.75) -52.932,2.493 R12.1@-52.925,2.5 ; R3.1@-52.925,-22.75 R3.1@-52.95,-22.75 -53.75,-22.75 ; R4.1@-52.925,-21.25 -53.75,-21.25 ; R5.1@-52.925,-19.75 R5.1@-52.95,-19.75 -53.75,-19.75 ; R6.1@-52.925,-18.25 R6.1@-52.95,-18.25 -53.691,-18.25 -53.75,-18.309 ; v1(-52.75,15.75) -52.75,15.682 -52.669,15.601 -52.669,15.032 -52.65,15.012 -52.65,14.15 U11.EP@-52.5,14 ; v1(-52.5,-25) -52.556,-25 -52.798,-24.758 -52.798,-24.377 -52.925,-24.25 R2.1@-52.95,-24.25 -53.5,-24.25 -53.75,-24 -53.75,-22.75 ; v1(-52.5,-16) -52.564,-16 -52.806,-16.242 -52.806,-16.631 -52.925,-16.75 R7.1@-52.95,-16.75 -53.633,-16.75 -53.75,-16.867 -53.75,-18.309 ; C4.1@-52.5,-6.75 -51.568,-6.75 -51.318,-7 v1(-51.25,-7) ; C68.1@-52.5,8.75 v1(-52.5,7.75) ; U11.EP@-52.375,14 -52,13.625 U11.5@-52,12.98 v1(-52,12.25) ; U1.38@-49.725,8.25 -51,8.25 -51.5,7.75 v1(-52.5,7.75) ; v1(-49.5,16) -49.5,15.5 -49.29,15.29 -49.29,15.04 C69.1@-49,14.75 -48.75,15 -46.883,15 ; C23.1@-47,13.94 -47,14.883 -46.883,15 ; C22.1@-45.5,13.94 -45.5,15 ; U1.31@-45.25,10.725 -45.25,12 -44.75,12.5 v1(-44.75,15) ; C20.1@-44,13.94 -44,15 ; C12.1@-43.44,-13 -43.429,-12.989 -43.429,-12.507 -42.75,-11.828 U1.83@-42.75,-10.725 v1(-42.75,-9.5) ; C2.1@-42.5,13.94 v1(-42.5,15) -44,15 ; U1.16@-37.75,10.725 -37.75,11.633 -37.633,11.75 -35,11.75 -34.25,12.5 -34.25,13.823 -34.367,13.94 C19.1@-35,13.94 -35,14.883 -35.117,15 ; C13.1@-37.44,-13 -37.25,-12.81 U1.94@-37.25,-10.725 v1(-37.25,-9.25) ; C1.1@-36.5,13.94 -36.5,14.75 -36.25,15 v1(-35.75,15) -35.117,15 ; C6.1@-33.5,13.94 -33.5,14.883 -33.617,15 ; U1.107@-30.75,-10.725 -30.75,-12 -30.25,-12.5 -30.25,-13.75 -30,-14 -29.56,-14 C14.1@-29.5,-13.94 v1(-29.5,-14.75) ; C24.1@-29.75,-24.94 -28.44,-24.94 -28.275,-24.775 SW3.2@-28.275,-21.5 -28.25,-21.475 v1(-28.25,-19.5) ; v1(-29.25,10.5) -29.25,8.5 -29,8.25 U1.143@-28.275,8.25 -27,8.25 C3.1@-25.5,9.75 -25.5,10.6 -25.093,11.007 -25.093,11.467 C18.1@-25.06,11.5 ; U1.130@-28.294,1.769 U1.130@-28.275,1.75 -28.269,1.744 -27.494,1.744 -26.75,1 -26.75,0.5 -26.5,0.25 -25.25,0.25 -25.06,0.44 C17.1@-25.06,1 -25.06,2.133 -24.943,2.25 v1(-24.5,2.25) ; U1.120@-28.275,-3.25 -25.25,-3.25 -25.06,-3.06 C16.1@-25.06,-2.5 -23.818,-2.5 -23.568,-2.75 v1(-23.5,-2.75) ; v1(-28,-14.75) C15.1@-28,-13.94 ; C5.1@-27.5,13.94 -27.5,15 ; C7.1@-26,13.94 -26,14.883 -26.117,15 v1(-26.75,15) -27.5,15 ; v1(-25.5,-15.5) D1.K@-25.5,-14.25 ; C3.1@-25.5,9.725 -24.823,9.048 -24.548,9.048 v1(-24.5,9) ; R21.1@-25.075,3.5 R21.1@-25.05,3.5 -24.5,3.5 -24.353,3.647 -24.353,4.103 ; C25.1@-25.06,5 -24.5,5 -24.353,4.853 -24.353,4.103 ; v1(-23.5,4) -24.25,4 -24.353,4.103 ; C30.1@1.56,-25 1.56,-24.44 1.8,-24.2 ; U2.10@1.8,-23.75 1.8,-24.2 ; U2.11@2.2,-23.75 2.2,-24.083 2.083,-24.2 1.8,-24.2 ; U2.3@2.6,-22.25 2.6,-22.1 3.25,-21.45 v1(3.25,-19.5) ; U3.2@16.125,-26.5 U3.2@16.187,-26.438 ; R31.1@16.75,-36.675 16.836,-36.761 16.836,-37.133 16.953,-37.25 18.25,-37.25 ; R37.1@18.25,-36.675 R37.1@18.25,-36.7 18.25,-37.25 ; v1(18.5,-8) 18.5,-8.43 19.06,-8.99 C45.1@19.06,-9 ; v1(18.75,-37.25) 18.25,-37.25 ; v1(19,-2.25) 19.037,-2.213 19.037,-1.537 R48.2@19.075,-1.5 ; C42.1@19.5,-5.25 v1(19.5,-4.25) ; R35.1@20.5,-25.075 R35.1@20.5,-25.05 20.5,-24.25 21.25,-23.5 21.25,-22.45 C32.1@21.7,-22 ; v1(21,-8.25) U5.23@22.3,-8.25 ; v1(21,-6.75) U5.20@22.3,-6.75 ; C44.1@22,1.44 v1(22,2.25) ; v1(22.75,-28.5) 22.75,-25.25 22.925,-25.075 R39.1@23.5,-25.075 ; v1(22.75,-15.75) 22.818,-15.75 22.999,-15.569 23.254,-15.569 23.45,-15.373 Q3.2@23.45,-15.2 ; C39.2@23.5,1.44 v1(23.5,2.25) ; U5.8@25.75,-1.8 v1(25.75,-0.75) ; C41.1@26.5,1.44 v1(26.5,2.25) ; v1(27.25,-16.25) 26.798,-15.798 26.798,-15.317 26.915,-15.2 Q1.2@27.45,-15.2 ; U5.35@28.75,-10.2 v1(28.75,-9) ; R38.1@29.5,-25.075 R38.1@29.5,-25.05 v1(29.5,-24.25) ; U5.47@30.7,-3.75 31.5,-3.75 v1(32,-4.25) ; C40.1@32.5,1.44 v1(32.5,2.25) ; v1(33,-5.25) 33.933,-5.25 ; v1(33,-3.75) 33.932,-3.75 ; v1(33,-2.25) 33.825,-2.25 33.933,-2.358 ; v1@33.062,-9.688 v1(33,-9.75) 33.918,-9.75 33.94,-9.772 ; v1(33.5,20) 33.94,20.44 C38.1@33.94,21 ; R51.1@33.7,-9.195 R51.1@33.895,-9 ; 33.75,22.61 D11.3@33.86,22.5 ; R51.1@33.925,-9 R51.1@33.895,-9 ; R40.1@33.925,-6 33.933,-5.993 33.933,-5.25 ; C46.1@33.94,-10.5 33.94,-9.772 ; R45.1@33.94,-1.5 33.933,-1.507 33.933,-2.358 ; C27.1@37,-25.7 37.3,-25.7 38.175,-26.575 J17.MP1@39.175,-26.575 ; J17.MP2@39.175,-36.925 39.25,-36.85 39.25,-35.25 v1(39.5,-35) ; J17.SWA@39.175,-32.775 39.25,-32.85 39.25,-33.475 39.5,-33.725 v1(39.5,-33.75) ; C54.1@41,-6.31 41.01,-6.31 41.475,-5.845 U7.1@43.175,-5.845 ; v1(43.25,-23.75) 43.25,-22.55 J17.6@43.525,-22.275 ; v1(50.25,-23.75) 50.25,-22.35 J17.MP4@50.325,-22.275 ; v1(51.25,-11.75) 51.828,-11.75 52,-11.578 R64.1@52,-11.575 ; v1(51.75,-9.5) 51.75,-9.558 51.925,-9.733 R58.1@51.925,-10.25 ; v1(51.75,-8) 51.75,-7.957 51.94,-7.767 C55.1@51.94,-7.25 ; v1(52.5,-35.75) 52.5,-37.2 J17.MP3@52.675,-37.375 ; -53.75,-22.75 -53.75,-21.25 ; -53.75,-21.25 -53.75,-19.75 ; -53.75,-19.75 -53.75,-18.309 ; -46.883,15 -45.5,15 ; -45.5,15 v1(-44.75,15) ; v1(-44.75,15) -44,15 ; -35.117,15 -33.617,15 ; -33.617,15 v1(-32.75,15) -27.5,15 ; R51.1@33.895,-9 33.94,-9.045 33.94,-9.772 ; 33.933,-5.25 33.933,-4.507 C47.1@33.94,-4.5 33.933,-4.492 33.933,-3.75 ; 33.933,-3.75 33.933,-3.007 33.925,-3 33.933,-2.992 33.933,-2.358
  L1 w0.3: v1(-1.25,-28.75) -1.25,-27 0.75,-25 C30.1@1.56,-25 ; C31.1@13.3,-22 13.25,-22.05 13.25,-27.25 13.925,-27.925 R34.1@14.5,-27.925 ; U3.2@16.187,-26.438 16.824,-26.438 17,-26.262 17,-25.25 17.75,-24.5 17.75,-24.336 17.763,-24.323 17.763,-24.16 C33.1@17.923,-24 ; v1(17.5,-22) 17.5,-22.75 17.75,-23 17.75,-23.664 17.763,-23.677 17.763,-23.84 C33.1@17.923,-24 ; C33.1@17.94,-24 C33.1@17.923,-24 ; C36.1@25.022,22.75 26.25,22.75 ; v1(26.25,23.5) 26.25,22.75 ; U8.5@27.513,14 U8.5@27.52,14 28.775,14 29.5,13.275 C62.1@29.5,13.25 ; U4.9@29.5,22.5 29.5,22.475 29.35,22.325 U4.2@28.575,22.325 27.115,22.325 C37.1@27,22.44 27,22.457 26.84,22.617 26.797,22.617 26.664,22.75 26.25,22.75 ; U4.9@30.5,22.5 30.5,22.825 30.65,22.975 U4.8@31.425,22.975 32.069,22.975 32.245,23.151 32.245,23.495 v1(32.25,23.5) ; J17.6@43.275,-22.275 43.275,-21.287 43.518,-21.044 44.016,-21.044 C26.1@44.06,-21
  L1 w0.4: 33.75,22.61 v1(33.75,23.5)
  L1 w0.45: v1(-52.5,-16) C21.1@-52.5,-14.25 ; J14.1@-18.5,-11.32 v1(-18.5,-6.75) ; J13.1@-18.5,8.18 v1(-18.5,9.5) ; J12.1@-6,-11.32 v1(-6,-10) ; J11.1@-6,8.18 v1(-6,9.5) ; J7.1@5,-11.32 v1(5,-10) ; J6.1@5,8.18 v1(5,9.5) ; v1(12.5,-20.5) v1(13.25,-20.5) ; C31.1@13.25,-21.95 v1(13.25,-20.5) ; v1(14,-20.5) v1(13.25,-20.5) ; C28.1@14.5,-32.19 14.56,-32.25 v1(15.25,-32.25) ; v1(19.75,-32.25) 20.415,-32.25 20.47,-32.195 C34.1@20.47,-32.16 ; C32.1@21.7,-22 21.7,-21.7 22.075,-21.325 22.264,-21.325 22.339,-21.25 v1(23,-21.25) ; D7.2@26.5,-24.125 26.5,-23.25 v1(27.25,-22.5) v1(28.25,-22.5) ; C27.1@37,-25.7 v1(37,-24.25)
  L1 w0.6: C29.1@2,-37 3.357,-37 4.175,-36.182 J18.SHELL2@4.175,-35.89 ; D3.A@2,-30.3 2.125,-30.3 2.225,-30.4 2.225,-30.525 3.128,-31.428 3.99,-31.428 4.175,-31.612 J18.SHELL1@4.175,-31.71 ; J18.SHELL1@4.175,-31.562 4.36,-31.377 5.3,-31.377 J18.A1/B12@5.3,-31.045 ; J18.B1/A12@11.7,-31.045 11.7,-31.377 12.64,-31.377 12.825,-31.562 J18.SHELL3@12.825,-31.71 ; v1(17.5,-31.25) D4.2@17.5,-30.125 ; J19.SHELL1@22.175,-31.71 22.175,-31.562 22.36,-31.377 23.3,-31.377 J19.A1/B12@23.3,-31.045 ; J19.B1/A12@29.7,-31.045 29.7,-31.377 30.64,-31.377 J19.SHELL3@30.825,-31.562 ; J19.SHELL4@30.825,-35.89 30.825,-36.182 31.643,-37 C35.1@33,-37 ; J19.SHELL3@30.825,-31.71 J19.SHELL3@30.825,-31.562 ; D6.A@33,-30.3 31.793,-30.3 30.825,-31.268 J19.SHELL3@30.825,-31.562
  other v1: 31.25,-22.5 33.25,-22.5 -22.25,-20.75 -1.75,-20.75 -26.5,-19.5 -30.25,-14.75 -43.75,-8.5 -40.75,-8.5 -38.25,-8.25 -30,-7.75 25.25,-6.5 -35.75,-6.25 -35.25,-5.75 -43.75,-3.75 25.25,-3.75 21,-3.25 -30.5,-0.25 -32,2.25 -47.25,3.75 -30.75,4.25 -47.25,4.75 -47.25,5.75 -47.25,6.75 -47.75,8.25 -46.75,8.25 -43.75,8.25 -39.75,8.25 -37.75,8.25 -33.75,8.25
  other v2: 40,-17.75 41.25,-17.75 51,-17.75 52,-17.75 40,-16.5 52,-16.5 40,-15.25 41.25,-15.25 51,-15.25 52,-15.25 46,-14.25 46,-13.5 41.75,-11.25 42.5,-11.25 37,-4.25 37.75,-4.25 54.25,-4 55,-4 37,-1.25 37.75,-1.25 54.25,-1.25 55,-1.25 37,1.75 37.75,1.75 54.25,1.75 55,1.75 37,4.5 37.75,4.5 37.25,10.75 39,11.25 53.25,11.25 24.5,12.5 25.5,12.5 26.5,12.5 27.5,12.5 30.75,12.5 31.75,12.5 32.75,12.5 33.75,12.5 39,12.5 53.25,12.5 19.25,13.5 20.5,13.5 21.5,13.5 30.75,13.5 31.75,13.5 32.75,13.5 33.75,13.5 39,13.75 53.25,13.75 37.25,14.25 19.25,14.5 20.5,14.5 21.5,14.5 19.25,15.5 20.5,15.5 21.5,15.5 24.5,15.5 25.5,15.5 26.5,15.5 27.5,15.5 30.75,15.5 31.75,15.5 32.75,15.5 33.75,15.5 39,16 19.25,16.5 20.5,16.5 21.5,16.5 24.5,16.5 25.5,16.5 19.25,17.5 20.5,17.5 21.5,17.5 22.5,17.5 23.5,17.5 24.5,17.5 25.5,17.5 39,17.5 39,19 39,20.5 42,23.25 39,24.75 42,24.75 39,26 40,26 41,26 42,26 43,26 44,26
  other v3: -50,-37 -45,-37 -40,-37 -30,-37 -25,-37 -20,-37 -15,-37 -10,-37 -5,-37 -64.25,-25 -64.25,-20 -64.25,-15 -64.25,-10 -64.25,-5 -64.25,0 -64.25,5 -64.25,10 -64.25,15 -64.25,20 -64.25,25 -50,37 -45,37 -40,37 -30,37 -25,37 -20,37 -15,37 -10,37 -5,37 0,37 5,37 10,37 15,37 20,37 25,37 30,37 40,37 45,37 50,37
  other v4: 45.45,-8.85 46.55,-8.85 45.45,-7.75 46.55,-7.75 45.45,-6.65 46.55,-6.65
  other v5: 26.5,13.6 -52.4,14 -51.6,14 26.5,14.4 29.6,21.5 30.4,21.5 29.6,22.5 30.4,22.5
HVIN: C59.2 D10.2 F1.1 J22.5 R55.2 U6.1 U6.2 | length 3.4
  L1 w0.152: U6.2@48.912,15.625 50.183,15.625 50.308,15.5 50.986,15.5 51.075,15.589 R55.2@51.075,16.75
  other v2: 62,-8 58,-4 58,-2 58,0 58,2 58,4 62,8 62,10 62,12 62,14 62,16 62,18
HVIN_UNFUSED_11: F1.2 J21.5
I2C1_SCL: J11.4 J15.7 R14.1 TP18.1 U1.139 | length 55.9
  L1 w0.2: U1.139@-28.275,6.25 -25,6.25 -20.5,1.75 -1.367,1.75 -1.25,1.867 -1.25,4.21 J15.7@-0.46,5 -0.46,6.633 -0.577,6.75 -2.883,6.75 -3,6.867 J11.4@-3,8.18 -3,15 TP18.1@-2.5,15.5 -2.5,17.883 -2.617,18 -7.75,18 -8.75,17 R14.1@-10.075,17
I2C1_SDA: J11.3 J15.8 R15.1 TP22.1 U1.140 | length 47.1
  L1 w0.2: U1.140@-28.275,6.75 -24.75,6.75 -20.25,2.25 -2.117,2.25 -2,2.367 -2,4 J15.8@-3,5 -4,6 -4,13 -4.25,13.25 -5,13.25 -5.45,13.7 -5.6,13.7 -6.5,14.6 TP22.1@-6.5,15.5 ; R15.1@-10.075,15.5 -8.5,15.5 -8.25,15.75 TP22.1@-6.75,15.75
I2C2_SCL: J12.4 J16.7 R16.1 TP19.1 U1.11 U2.8 | length 98.6
  L1 w0.2: U1.11@-35.25,10.725 -35.25,9.75 -34.75,9.25 v1(-34.75,7.75) ; R16.1@-10.075,-17 R16.1@-10.05,-17 -10.025,-17 -9.025,-18 -4.1,-18 -2.5,-16.4 TP19.1@-2.5,-15.5 -3,-15 J12.4@-3,-11.32 -3,-7 -2.75,-6.75 -0.75,-6.75 -0.5,-6.5 J16.7@-0.5,-5 ; v1(-0.75,-19.5) -0.5,-19.75 -0.5,-22.25 0,-22.75 0,-23 0.2,-23.2 U2.8@1.35,-23.2
  L4 w0.2: v1(-34.75,7.75) -36.75,5.75 -36.75,-3.133 -36.633,-3.25 -25.5,-3.25 -24,-1.75 -2.25,-1.75 -0.5,-3.5 -0.5,-5 0.5,-6 0.5,-19.883 0.383,-20 -0.116,-20 -0.25,-20 v1(-0.75,-19.5)
I2C2_SDA: J12.3 J16.8 R17.1 TP23.1 U1.10 U2.7 | length 90.7
  L1 w0.2: U1.10@-34.75,10.725 -34.731,10.706 -34.731,9.981 -34.296,9.546 -34.296,8.796 v1(-34.25,8.75) ; R17.1@-10.075,-15.5 -9.25,-15.5 -9,-15.75 -6.75,-15.75 TP23.1@-6.5,-15.5 -6.5,-13.117 -6.383,-13 -4.117,-13 -4,-12.883 J12.3@-4,-11.32 -4,-6.5 -3.75,-6.25 -3.25,-6.25 -3.04,-6.04 J16.8@-3.04,-5 ; v1(0,-19.5) 0,-22 0.8,-22.8 U2.7@1.35,-22.8
  L4 w0.2: v1(-34.25,8.75) -34.296,8.704 -34.546,8.704 -37.25,6 -37.25,-3.25 -36.75,-3.75 -25.25,-3.75 -23.75,-2.25 -4.657,-2.25 -3.04,-3.867 -3.04,-5 -1.79,-6.25 -0.117,-6.25 0,-6.367 v1(0,-19.5)
MCO_3: R19.1 TP1.1 | length 15.3
  L1 w0.2: v1(-31,-14.75) R19.1@-31,-13.925 ; TP1.1@-25.75,-24.75 v1(-25.75,-19.5)
  L4 w0.2: v1(-31,-14.75) -30.5,-15.25 -26.5,-15.25 -25.75,-16 v1(-25.75,-19.5)
NetC29_2: C29.2 R30.1 | length 1.8
  L1 w0.6: C29.2@2,-35.5 R30.1@2,-33.725
NetC35_2: C35.2 R36.1 | length 1.8
  L1 w0.6: C35.2@33,-35.361 R36.1@33,-33.586
NetD1_A: D1.A R11.1 | length 1.9
  L1 w0.2: R11.1@-25.925,-11 -25.925,-12.233 -25.5,-12.658 D1.A@-25.5,-12.75
NetD2_K: D2.K R31.2 | length 2.3
  L1 w0.2: D2.K@15,-35.75 15,-35.615 15.365,-35.25 16.175,-35.25 16.525,-35.6 16.555,-35.6 16.75,-35.795 R31.2@16.75,-35.825
NetD5_K: D5.K R37.2 | length 2.2
  L1 w0.2: R37.2@18.25,-35.825 18.25,-35.795 18.795,-35.25 19.5,-35.25 D5.K@20,-35.75
NetD8_A: D8.A R41.1 | length 2.1
  L1 w0.2: R41.1@27.881,-17.5 29.233,-17.5 29.733,-17 D8.A@29.75,-17
NetD9_A: D9.A R42.1 | length 2.2
  L1 w0.2: D9.A@23.25,-17 23.267,-17 24.017,-16.25 24.675,-16.25 24.775,-16.35 24.805,-16.35 25,-16.545 R42.1@25,-16.575
NetQ2_2: Q2.2 R52.2 | length 7.8
  L1 w0.2: Q2.2@31.45,-15.2 31.45,-13.977 31.452,-13.975 31.452,-13.798 v1(31.5,-13.75)
  L1 w0.3: v1(33,-11.5) 33.5,-12 R52.2@33.5,-13.575
  L4 w0.2: v1(31.5,-13.75) 33.133,-13.75 33.25,-13.633 33.25,-12.725 33,-12.475 v1(33,-11.5)
NetR19_2: R19.2 U1.100 | length 4.7
  L1 w0.2: U1.100@-34.25,-10.725 -34.244,-10.731 -34.244,-11.506 -34,-11.75 -32.75,-11.75 -31.458,-13.042 -31.033,-13.042 R19.2@-31,-13.075
NRST: C24.2 R20.1 SW3.1 U1.25 U5.18 | length 163.3
  L1 w0.2: v1(-45.25,-19.75) -32.842,-19.75 -32.725,-19.867 SW3.1@-32.725,-21.5 -31.5,-21.5 -31.25,-21.75 -31.25,-23.25 ; U1.25@-42.25,10.725 -42.25,9.75 v1(-41.75,9.25) ; R20.1@-31.25,-24.075 -31.25,-23.25 ; C24.2@-29.75,-24.06 -29.75,-23.367 -29.867,-23.25 -31.25,-23.25 ; U5.18@22.3,-5.75 v1(25.25,-5.75)
  L4 w0.2: v1(-45.25,-19.75) -45.25,-5.25 ; v1(-41.75,9.25) -41.75,7.867 -41.633,7.75 -37.867,7.75 -37.75,7.633 -37.75,-3.133 -37.867,-3.25 -44.75,-3.25 -45.25,-3.75 -45.25,-5.25 ; v1(25.25,-5.75) 26.75,-7.25 26.75,-22.75 25,-24.5 -4.5,-24.5 -23.75,-5.25 -45.25,-5.25
PA0: J1.6 TP6.1 U1.34 | length 44.6
  L1 w0.2: v1(-46.75,9.25) U1.34@-46.75,10.725 ; TP6.1@-39.83,18.5 J1.6@-39.83,34
  L4 w0.2: v1(-46.75,9.25) -46.75,13.75 -41,19.5 -41,32.83 J1.6@-39.83,34
PA1: J1.5 TP5.1 U1.35 | length 40.5
  L1 w0.2: v1(-47.25,8.75) U1.35@-47.25,10.725 ; TP5.1@-42.37,23.5 J1.5@-42.37,34
  L4 w0.2: v1(-47.25,8.75) -47.25,14 -41.5,19.75 -41.5,33.13 J1.5@-42.37,34
PA2: J1.4 TP4.1 U1.36 | length 45.9
  L1 w0.2: v1(-47.75,9.25) U1.36@-47.75,10.725 ; TP4.1@-44.91,18.5 J1.4@-44.91,34
  L4 w0.2: v1(-47.75,9.25) -47.75,14.25 -42,20 -42,32.1 -42.65,32.75 -43.66,32.75 J1.4@-44.91,34
PA3: J1.3 TP3.1 U1.37 | length 43.3
  L1 w0.2: U1.37@-49.725,8.75 v1(-48.25,8.75) ; TP3.1@-47.45,23.5 J1.3@-47.45,34
  L4 w0.2: v1(-48.25,8.75) -48.25,14.5 -42.5,20.25 -42.5,31.85 -42.9,32.25 -45.7,32.25 J1.3@-47.45,34
PA4: J1.2 TP2.1 U1.40 | length 53.3
  L1 w0.2: TP2.1@-49.99,18.5 J1.2@-49.99,34 ; U1.40@-49.725,7.25 v1(-47.75,7.25)
  L4 w0.2: J1.2@-49.99,34 -47.74,31.75 -43.15,31.75 -43,31.6 -43,20.5 -49,14.5 -49,7.75 -48.5,7.25 v1(-47.75,7.25)
PA5: J10.9 U1.41 | length 27.7
  L1 w0.2: U1.41@-49.725,6.75 v1(-48.25,6.75)
  L4 w0.2: J10.9@-61.16,22.5 J10.9@-61.25,22.59 -59,20.34 -59,15.75 -58.75,15.5 -55.75,15.5 -53.75,13.5 -53.75,7 -53.5,6.75 v1(-48.25,6.75)
PA6: J10.8 U1.42 | length 26.7
  L1 w0.2: U1.42@-49.725,6.25 v1(-47.75,6.25)
  L4 w0.2: J10.8@-61.2,20 J10.8@-61.25,20.05 -59.5,18.3 -59.5,15.5 -59,15 -56,15 -54.25,13.25 -54.25,6.75 -53.75,6.25 v1(-47.75,6.25)
PA7: J10.7 U1.43 | length 23.7
  L1 w0.2: U1.43@-49.725,5.75 v1(-48.25,5.75)
  L4 w0.2: J10.7@-61.25,17.51 -60,16.26 -60,15.25 -59.25,14.5 -56.25,14.5 -54.75,13 -54.75,6.5 -54,5.75 v1(-48.25,5.75)
PA15: J5.4 U1.110 | length 47.7
  L1 w0.2: v1(-32,-8.25) U1.110@-28.275,-8.25
  L4 w0.2: v1(-32,-8.25) -33.25,-9.5 -33.25,-19.5 -29.5,-23.25 -16.75,-23.25 -13,-27 -13,-31.9 -12.15,-32.75 -11.14,-32.75 J5.4@-9.89,-34
PB0: J10.4 U1.46 | length 24.8
  L1 w0.2: U1.46@-49.725,4.25 v1(-47.75,4.25)
  L4 w0.2: J10.4@-61.25,9.89 -60,11.14 -60,12.25 -59.25,13 -57,13 -56.25,12.25 -56.25,5.75 -54.75,4.25 v1(-47.75,4.25)
PB1: J10.3 U1.47 | length 25.7
  L1 w0.2: U1.47@-49.725,3.75 v1(-48.25,3.75)
  L4 w0.2: J10.3@-61.25,7.35 -59.5,9.1 -59.5,12 -59,12.5 -57.25,12.5 -56.75,12 -56.75,5.5 -55,3.75 v1(-48.25,3.75)
PB2: J2.2 U1.48 | length 50.8
  L1 w0.2: U1.48@-49.725,3.25 -47.75,3.25 -47.25,2.75 -42.75,2.75 -42.25,3.25 v1(-42.25,8.75)
  L4 w0.2: v1(-42.25,8.75) -42.25,14.5 -38.5,18.25 -38.5,25 -31,32.5 -24.09,32.5 J2.2@-22.59,34
PB4: J4.5 U1.134 | length 88
  L1 w0.2: v1(-30.25,3.75) U1.134@-28.275,3.75
  L4 w0.2: v1(-30.25,3.75) -29,3.75 -27.25,5.5 -27.25,11.25 -24.75,13.75 6,13.75 23,30.75 36.58,30.75 J4.5@39.83,34
PB5: J4.4 U1.135 | length 84.2
  L1 w0.2: v1(-29.75,4.25) U1.135@-28.275,4.25
  L4 w0.2: v1(-29.75,4.25) -29.25,4.25 -27.75,5.75 -27.75,11.5 -25,14.25 5.75,14.25 22.75,31.25 34.54,31.25 J4.4@37.29,34
PB6: J4.3 U1.136 | length 82.5
  L1 w0.2: v1(-30.25,4.75) U1.136@-28.275,4.75
  L4 w0.2: v1(-30.25,4.75) -29.5,4.75 -28.25,6 -28.25,11.75 -25.25,14.75 5.5,14.75 22.5,31.75 32.5,31.75 J4.3@34.75,34
PB7: J4.2 U1.137 | length 78.7
  L1 w0.2: v1(-29.75,5.25) U1.137@-28.275,5.25
  L4 w0.2: v1(-29.75,5.25) -28.75,6.25 -28.75,12 -25.5,15.25 5.25,15.25 22.25,32.25 30.5,32.25 32.21,33.96 J4.2@32.21,34
PB10: J8.8 U1.69 | length 35.3
  L1 w0.2: U1.69@-49.725,-7.25 v1(-48.5,-7.25)
  L4 w0.2: v1(-48.5,-7.25) -48.525,-7.275 -49.025,-7.275 -49.25,-7.5 -49.25,-19.75 -42.25,-26.75 -42.25,-31.7 -42.8,-32.25 -45.7,-32.25 J8.8@-47.45,-34
PC0: J10.2 U1.26 | length 39
  L1 w0.2: v1(-46.75,3.25) -43,3.25 -42.75,3.5 U1.26@-42.75,10.725
  L4 w0.2: J10.2@-61.25,4.81 -59,7.06 -59,11.75 -58.75,12 -57.5,12 -57.25,11.75 -57.25,5.25 -55.25,3.25 v1(-46.75,3.25)
PC1: J1.9 TP9.1 U1.27 | length 45
  L1 w0.2: v1(-43.25,8.75) U1.27@-43.25,10.725 ; TP9.1@-32.21,23.5 J1.9@-32.21,34
  L4 w0.2: v1(-43.25,8.75) -43.25,15 -39.5,18.75 -39.5,31.4 -39.15,31.75 -34.46,31.75 J1.9@-32.21,34
PC2: J1.8 TP8.1 U1.28 | length 47.2
  L1 w0.2: v1(-43.75,9.25) U1.28@-43.75,10.725 ; TP8.1@-34.75,18.5 J1.8@-34.75,34
  L4 w0.2: v1(-43.75,9.25) -43.75,15.25 -40,19 -40,31.65 -39.4,32.25 -36.5,32.25 J1.8@-34.75,34
PC3: J1.7 TP7.1 U1.29 | length 41.3
  L1 w0.2: v1(-44.25,8.75) U1.29@-44.25,10.725 ; TP7.1@-37.29,23.5 J1.7@-37.29,34
  L4 w0.2: v1(-44.25,8.75) -44.25,15.5 -40.5,19.25 -40.5,31.9 -39.65,32.75 -38.54,32.75 J1.7@-37.29,34
PC4: J10.6 U1.44 | length 23.6
  L1 w0.2: U1.44@-49.725,5.25 v1(-47.75,5.25)
  L4 w0.2: v1(-47.75,5.25) -54.25,5.25 -55.25,6.25 -55.25,12.75 -56.5,14 -60.28,14 J10.6@-61.027,14.747 ; J10.6@-61.027,14.747 J10.6@-61.25,14.97 J10.6@-61.027,14.747
PC5: J10.5 U1.45 | length 22.8
  L1 w0.2: U1.45@-49.725,4.75 v1(-48.25,4.75)
  L4 w0.2: J10.5@-60.963,12.143 J10.5@-61.25,12.43 -60.18,13.5 -56.75,13.5 -55.75,12.5 -55.75,6 -54.5,4.75 v1(-48.25,4.75)
PC6: J5.6 U1.96 | length 47.1
  L1 w0.2: U1.96@-36.25,-10.725 v1(-36.25,-9.25)
  L4 w0.2: v1(-36.25,-9.25) -37.25,-10.25 -37.25,-22 -34.5,-24.75 -16.75,-24.75 -14,-27.5 -14,-33.03 J5.6@-14.97,-34
PC7: J5.5 U1.97 | length 48.1
  L1 w0.2: U1.97@-35.75,-10.725 v1(-35.75,-8.75)
  L4 w0.2: v1(-35.75,-8.75) -35.75,-9.75 -36.75,-10.75 -36.75,-21.75 -35,-23.5 -34.25,-24.25 -16.5,-24.25 -13.5,-27.25 -13.5,-32.93 J5.5@-12.43,-34
PD3: J5.3 U1.117 | length 52
  L1 w0.2: v1(-31.5,-7.75) -30.75,-7.75 -30.5,-7.5 -30.5,-5.5 -29.75,-4.75 U1.117@-28.275,-4.75
  L4 w0.2: v1(-31.5,-7.75) -31.5,-8.5 -32.75,-9.75 -32.75,-19.25 -29.25,-22.75 -16.5,-22.75 -12.5,-26.75 -12.5,-31.65 -11.9,-32.25 -9.1,-32.25 J5.3@-7.35,-34
PD4: J5.2 U1.118 | length 53.9
  L1 w0.2: v1(-31,-7.25) -31,-5.25 -30,-4.25 U1.118@-28.275,-4.25
  L4 w0.2: v1(-31,-7.25) -31,-8.75 -32.25,-10 -32.25,-19 -29,-22.25 -16.25,-22.25 -12,-26.5 -12,-31.4 -11.65,-31.75 -7.06,-31.75 J5.2@-4.81,-34
PD10: J8.7 U1.79 | length 28.9
  L1 w0.2: U1.79@-44.75,-10.725 v1(-44.75,-9.5)
  L4 w0.2: J8.7@-44.91,-34 -43.66,-32.75 -42.55,-32.75 -41.75,-31.95 -41.75,-26.5 -44.75,-23.5 v1(-44.75,-9.5)
PD11: J8.6 U1.80 | length 28.4
  L1 w0.2: U1.80@-44.25,-10.725 v1(-44.25,-9)
  L4 w0.2: v1(-44.25,-9) -44.25,-23.25 -41.25,-26.25 -41.25,-32.88 J8.6@-42.37,-34